# Altium PCB A313_5.PcbDoc (part 1 of 4)
Units mm, origin at the board's own origin, x right, y up, seen from the top; angles counter-clockwise.
Board outline 230.01 x 157.01 mm, 2 copper layers (Top Layer, Bottom Layer); 173 components, 153 nets, 1229 pads, 884 vias.
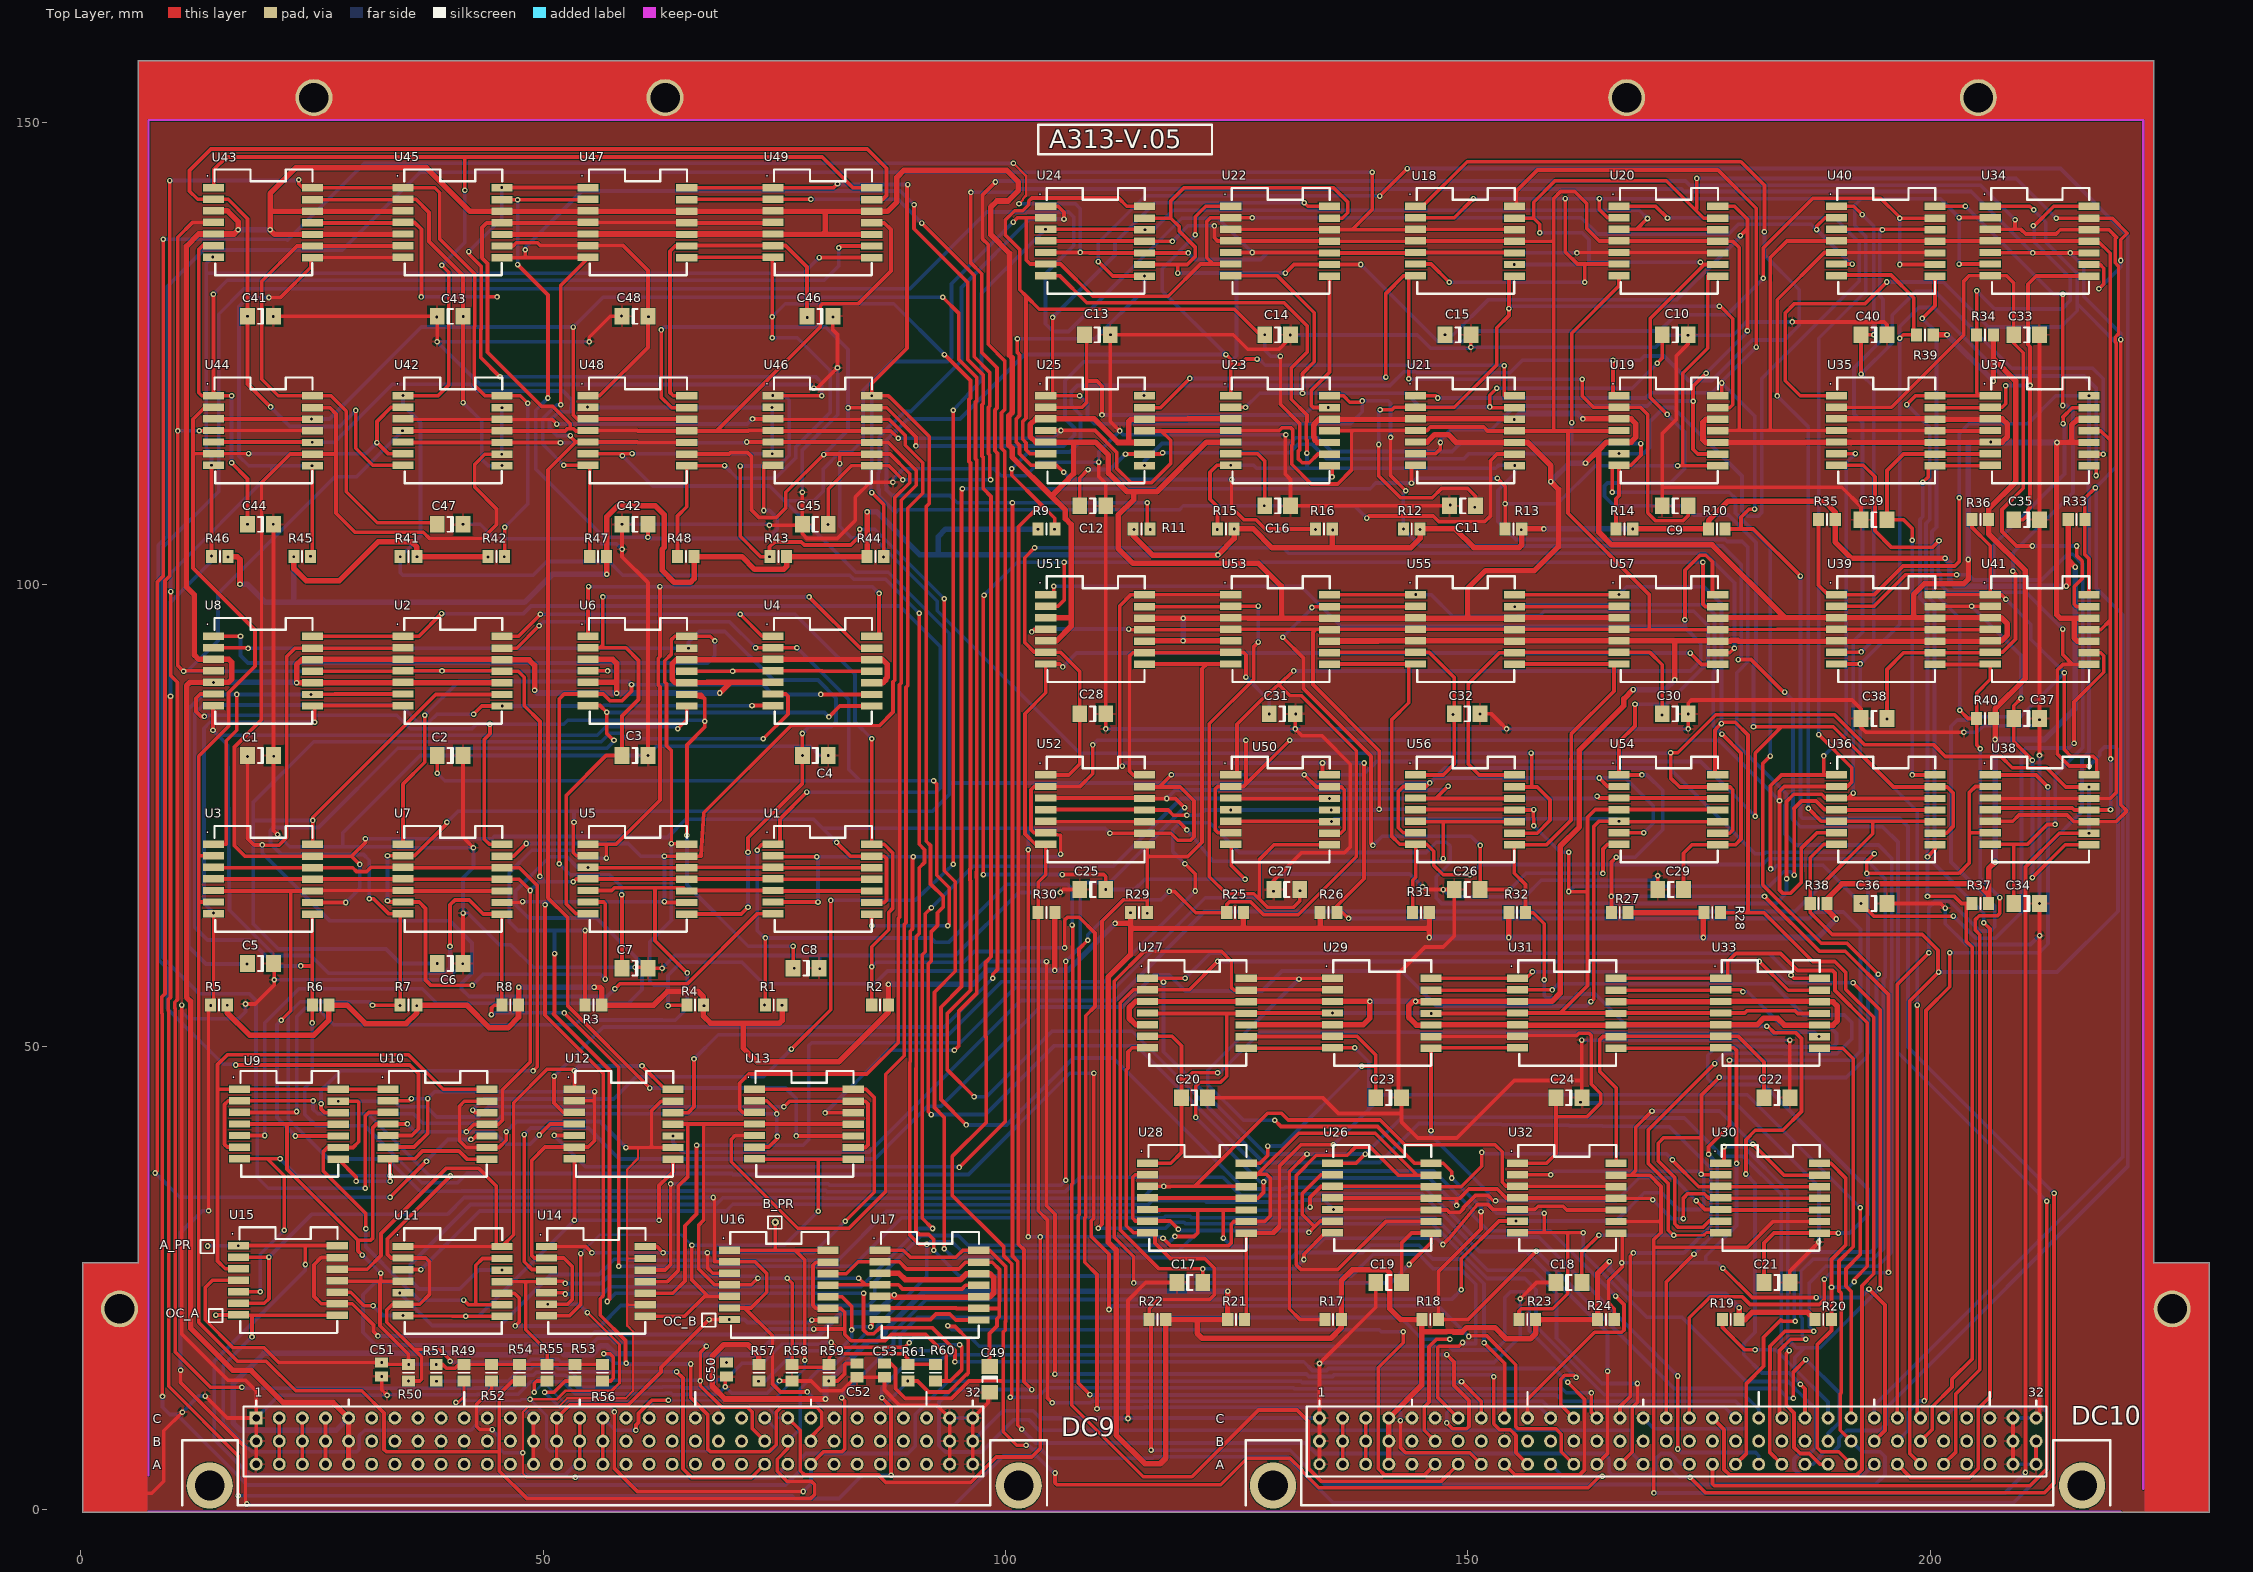
[diagram p0: Top Layer view]
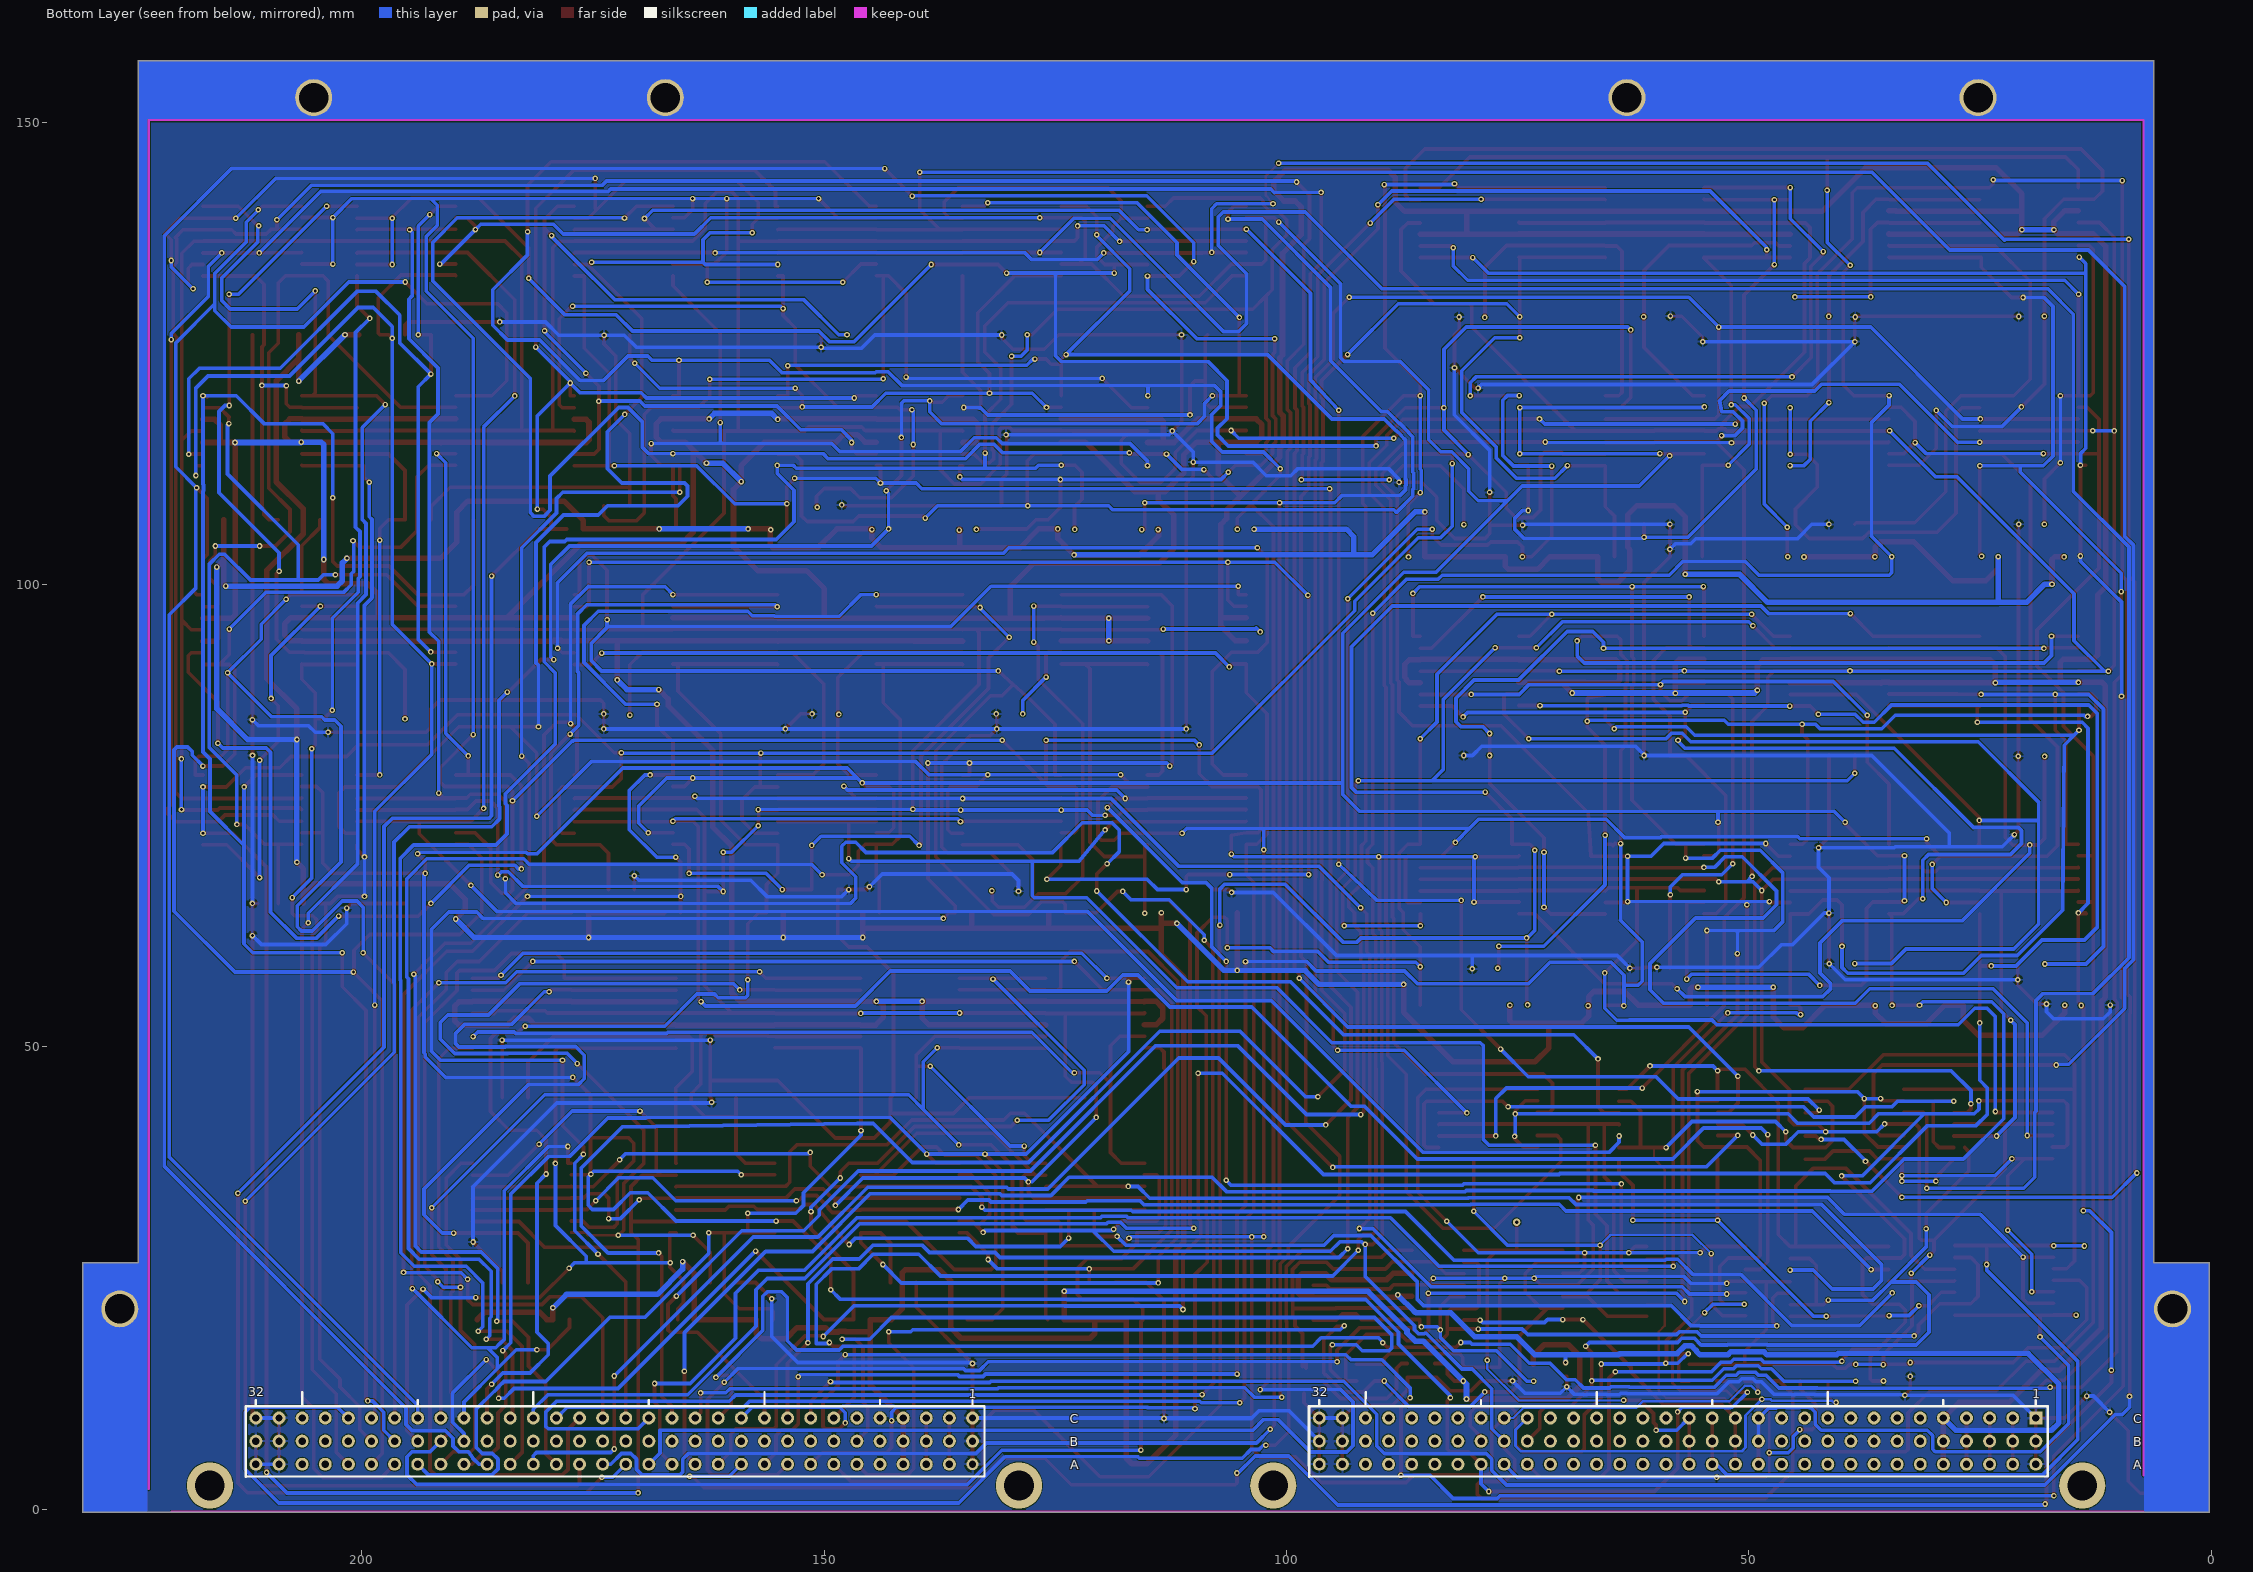
[diagram p1: Bottom Layer view, seen from below]

## Layer stack, top to bottom
Top Solder: solder mask 0.0102, Solder Resist, Dk 3.5
Top Layer: signal copper 0.0356
Dielectric 1: dielectric 0.32, FR-4, Dk 4.8
Bottom Layer: signal copper 0.0356
Bottom Solder: solder mask 0.0102, Solder Resist, Dk 3.5

## Board outline
0.18,-0.354 0.18,26.646 cw(c0.187,26.646) 0.187,26.653 6.18,26.653 6.18,156.646 cw(c6.187,156.646) 6.187,156.653 224.187,156.653 cw(c224.187,156.646) 224.194,156.646 224.194,26.653 230.187,26.653 cw(c230.187,26.646) 230.194,26.646 230.194,-0.354 cw(c230.187,-0.354) 230.187,-0.361 0.187,-0.361 cw(c0.187,-0.354)

## Design rules (kind name [scope] priority, off if disabled: settings)
Clearance [All] p1: gap=0.1 ignorepadtopadclearanceinfootprint=FALSE
HoleSize [All] p1: absolutevalues=TRUE maxlimit=10 minlimit=0.025 maxpercent=80.000 minpercent=20.000
MinimumSolderMaskSliver [All] p1: minsoldermaskwidth=0
PolygonConnect [All] p1: connectstyle=Relief reliefconductorwidth=0.254 reliefentries=4 polygonreliefangle="90 Angle" airgapwidth=0.254
RoutingVias [All] p1: holewidth=0.3 width=0.6 viastyle="Through Hole" minholewidth=0.3 minwidth=0.6 maxholewidth=0.3 maxwidth=0.6
SilkToSilkClearance [All] p1: silktosilkclearance=0.1
SilkToSolderMaskClearance [IsPad] p1: minsilkscreentomaskgap=0 clearancetoexposedcopper=TRUE
SolderMaskExpansion [All] p1: expansion=0.102
Width [All] p1: maxlimit=1 minlimit=0.254 preferedwidth=0.4
26 further rules are at their usual default settings.

## Components (designator, comment, footprint, x,y, rotation, side; value= is the part's Value field where it differs from the comment)
C1 "4,7uf" 1206 19.425,81.5 r180 top
C2 "4,7uf" 1206 39.925,81.5 r180 top
C3 "4,7uf" 1206 59.925,81.5 r180 top
C4 "4,7uf" 1206 79.425,81.5 r180 top
C5 "4,7uf" 1206 19.425,59 r180 top
C6 "4,7uf" 1206 39.925,59 r180 top
C7 "4,7uf" 1206 59.925,58.5 r180 top
C8 "4,7uf" 1206 78.425,58.5 r180 top
C9 "4,7uf" 1206 172.425,108.5 r0 top
C10 "4,7uf" 1206 172.425,127 r180 top
C11 "4,7uf" 1206 149.425,108.5 r0 top
C12 "4,7uf" 1206 109.425,108.5 r180 top
C13 "4,7uf" 1206 109.925,127 r180 top
C14 "4,7uf" 1206 129.425,127 r180 top
C15 "4,7uf" 1206 148.925,127 r180 top
C16 "4,7uf" 1206 129.425,108.5 r180 top
C17 "4,7uf" 1206 119.925,24.5 r0 top
C18 "4,7uf" 1206 160.925,24.5 r0 top
C19 "4,7uf" 1206 141.425,24.5 r0 top
C20 "4,7uf" 1206 120.425,44.5 r180 top
C21 "4,7uf" 1206 183.425,24.5 r180 top
C22 "4,7uf" 1206 183.425,44.5 r180 top
C23 "4,7uf" 1206 141.425,44.5 r180 top
C24 "4,7uf" 1206 160.925,44.5 r180 top
C25 "4,7uf" 1206 109.425,67 r0 top
C26 "4,7uf" 1206 149.925,67 r0 top
C27 "4,7uf" 1206 130.425,67 r0 top
C28 "4,7uf" 1206 109.425,86 r180 top
C29 "4,7uf" 1206 171.925,67 r0 top
C30 "4,7uf" 1206 172.425,86 r180 top
C31 "4,7uf" 1206 129.925,86 r180 top
C32 "4,7uf" 1206 149.925,86 r180 top
C33 "4,7uf" 1206 210.425,127 r180 top
C34 "4,7uf" 1206 210.425,65.5 r180 top
C35 "4,7uf" 1206 210.425,107 r180 top
C36 "4,7uf" 1206 193.925,65.5 r180 top
C37 "4,7uf" 1206 210.425,85.5 r180 top
C38 "4,7uf" 1206 193.925,85.5 r0 top
C39 "4,7uf" 1206 193.925,107 r0 top
C40 "4,7uf" 1206 193.925,127 r180 top
C41 "4,7uf" 1206 19.425,129 r180 top
C42 "4,7uf" 1206 59.925,106.5 r0 top
C43 "4,7uf" 1206 39.925,129 r0 top
C44 "4,7uf" 1206 19.425,106.5 r180 top
C45 "4,7uf" 1206 79.425,106.5 r0 top
C46 "4,7uf" 1206 79.925,129 r180 top
C47 "4,7uf" 1206 39.925,106.5 r180 top
C48 "4,7uf" 1206 59.925,129 r0 top
C49 "4,7uf" 1206 98.307,14.025 r270 top
C50 "0,068uf" C0805 69.825,15.1 r270 top
C51 "0,068uf" C0805 32.525,15.1 r270 top
C52 "0,068uf" C0805 83.925,15 r270 top
C53 "0,01uf" C0805 86.925,15 r270 top
DC9 "DC96c" DC96c_DUC#1 53.225,22.925 r0 top locked
DC10 "DC96c" DC96c_DUC#2 168.225,22.925 r0 top locked
R1 "330k" 6-0805_N 74.925,54.5 r180 top
R2 "330k" 6-0805_N 86.425,54.5 r180 top
R3 "330k" 6-0805_N 55.425,54.5 r180 top
R4 "330k" 6-0805_N 66.425,54.5 r180 top
R5 "330k" 6-0805_N 14.925,54.5 r0 top
R6 "330k" 6-0805_N 25.925,54.5 r0 top
R7 "330k" 6-0805_N 35.425,54.5 r0 top
R8 "330k" 6-0805_N 46.425,54.5 r0 top
R9 "330k" 6-0805_N 104.425,106 r0 top
R10 "330k" 6-0805_N 176.925,106 r0 top
R11 "330k" 6-0805_N 114.7,106 r0 top
R12 "330k" 6-0805_N 143.925,106 r180 top
R13 "330k" 6-0805_N 154.925,106 r0 top
R14 "330k" 6-0805_N 166.925,106 r0 top
R15 "330k" 6-0805_N 123.825,106 r0 top
R16 "330k" 6-0805_N 134.425,106 r0 top
R17 "330k" 6-0805_N 135.425,20.5 r180 top
R18 "330k" 6-0805_N 145.925,20.5 r0 top
R19 "330k" 6-0805_N 178.425,20.5 r180 top
R20 "330k" 6-0805_N 188.425,20.5 r0 top
R21 "330k" 6-0805_N 124.925,20.5 r180 top
R22 "330k" 6-0805_N 116.425,20.5 r0 top
R23 "330k" 6-0805_N 156.425,20.5 r0 top
R24 "330k" 6-0805_N 164.925,20.5 r180 top
R25 "330k" 6-0805_N 124.825,64.5 r180 top
R26 "330k" 6-0805_N 134.925,64.5 r0 top
R27 "330k" 6-0805_N 166.425,64.5 r180 top
R28 "330k" 6-0805_N 176.425,64.5 r0 top
R29 "330k" 6-0805_N 114.425,64.5 r180 top
R30 "330k" 6-0805_N 104.425,64.5 r0 top
R31 "330k" 6-0805_N 144.925,64.5 r0 top
R32 "330k" 6-0805_N 155.325,64.5 r180 top
R33 "330k" 6-0805_N 215.825,107 r0 top
R34 "330k" 6-0805_N 205.925,127 r180 top
R35 "330k" 6-0805_N 188.825,107 r180 top
R36 "330k" 6-0805_N 205.425,107 r180 top
R37 "330k" 6-0805_N 205.425,65.5 r0 top
R38 "330k" 6-0805_N 187.925,65.5 r0 top
R39 "330k" 6-0805_N 199.425,127 r0 top
R40 "330k" 6-0805_N 205.925,85.5 r0 top
R41 "330k" 6-0805_N 35.425,103 r180 top
R42 "330k" 6-0805_N 44.925,103 r0 top
R43 "330k" 6-0805_N 75.425,103 r180 top
R44 "330k" 6-0805_N 85.925,103 r0 top
R45 "330k" 6-0805_N 23.925,103 r180 top
R46 "330k" 6-0805_N 15.025,103 r0 top
R47 "330k" 6-0805_N 55.925,103 r0 top
R48 "330k" 6-0805_N 65.425,103 r0 top
R49 "330k" 6-0805_N 41.425,14.75 r90 top
R50 "330k" 6-0805_N 35.425,14.75 r90 top
R51 "330k" 6-0805_N 38.425,14.75 r90 top
R52 "330k" 6-0805_N 44.425,14.75 r90 top
R53 "330k" 6-0805_N 53.425,14.75 r270 top
R54 "330k" 6-0805_N 47.425,14.75 r270 top
R55 "330k" 6-0805_N 50.425,14.75 r270 top
R56 "330k" 6-0805_N 56.425,14.75 r270 top
R57 "3,3k" 6-0805_N 73.325,14.75 r90 top
R58 "1,2k" 6-0805_N 76.925,14.75 r90 top
R59 "1,8k" 6-0805_N 80.925,14.75 r270 top
R60 "330k" 6-0805_N 92.425,14.75 r90 top
R61 "330k" 6-0805_N 89.425,14.75 r90 top
U1 "168KT2B_1" 168KT2B 79.925,68 r0 top
U2 "168KT2B_1" 168KT2B 39.925,90.5 r0 top
U3 "168KT2B_1" 168KT2B 19.425,68 r0 top
U4 "168KT2B_1" 168KT2B 79.925,90.5 r0 top
U5 "168KT2B_1" 168KT2B 59.925,68 r0 top
U6 "168KT2B_1" 168KT2B 59.925,90.5 r0 top
U7 "168KT2B_1" 168KT2B 39.925,68 r0 top
U8 "168KT2B_1" 168KT2B 19.425,90.5 r0 top
U9 "168KT2B_1" 168KT2B 22.225,41.5 r0 top
U10 "168KT2B_1" 168KT2B 38.3,41.5 r0 top
U11 "168KT2B_1" 168KT2B 39.925,24.5 r0 top
U12 "168KT2B_1" 168KT2B 58.425,41.5 r0 top
U13 "168KT2B_1" 168KT2B 77.925,41.5 r0 top
U14 "168KT2B_1" 168KT2B 55.425,24.5 r0 top
U15 "168KT2B_1" 168KT2B 22.125,24.6 r0 top
U16 "168KT2B_1" 168KT2B 75.2,24.1 r0 top
U17 "168KT2B_1" 168KT2B 91.5,24.1 r0 top
U18 "168KT2B_1" 168KT2B 149.425,137 r0 top
U19 "168KT2B_1" 168KT2B 171.425,116.5 r0 top
U20 "168KT2B_1" 168KT2B 171.425,137 r0 top
U21 "168KT2B_1" 168KT2B 149.425,116.5 r0 top
U22 "168KT2B_1" 168KT2B 129.425,137 r0 top
U23 "168KT2B_1" 168KT2B 129.425,116.5 r0 top
U24 "168KT2B_1" 168KT2B 109.425,137 r0 top
U25 "168KT2B_1" 168KT2B 109.425,116.5 r0 top
U26 "168KT2B_1" 168KT2B 140.425,33.5 r0 top
U27 "168KT2B_1" 168KT2B 120.425,53.5 r0 top
U28 "168KT2B_1" 168KT2B 120.425,33.5 r0 top
U29 "168KT2B_1" 168KT2B 140.425,53.5 r0 top
U30 "168KT2B_1" 168KT2B 182.425,33.5 r0 top
U31 "168KT2B_1" 168KT2B 160.425,53.5 r0 top
U32 "168KT2B_1" 168KT2B 160.425,33.5 r0 top
U33 "168KT2B_1" 168KT2B 182.425,53.5 r0 top
U34 "168KT2B_1" 168KT2B 211.571,137 r0 top
U35 "168KT2B_1" 168KT2B 194.925,116.5 r0 top
U36 "168KT2B_1" 168KT2B 194.925,75.5 r0 top
U37 "168KT2B_1" 168KT2B 211.571,116.5 r0 top
U38 "168KT2B_1" 168KT2B 211.571,75.5 r0 top
U39 "168KT2B_1" 168KT2B 194.925,95 r0 top
U40 "168KT2B_1" 168KT2B 194.925,137 r0 top
U41 "168KT2B_1" 168KT2B 211.571,95 r0 top
U42 "168KT2B_1" 168KT2B 39.925,116.5 r0 top
U43 "168KT2B_1" 168KT2B 19.425,139 r0 top
U44 "168KT2B_1" 168KT2B 19.425,116.5 r0 top
U45 "168KT2B_1" 168KT2B 39.925,139 r0 top
U46 "168KT2B_1" 168KT2B 79.925,116.5 r0 top
U47 "168KT2B_1" 168KT2B 59.925,139 r0 top
U48 "168KT2B_1" 168KT2B 59.925,116.5 r0 top
U49 "168KT2B_1" 168KT2B 79.925,139 r0 top
U50 "168KT2B_1" 168KT2B 129.425,75.5 r0 top
U51 "168KT2B_1" 168KT2B 109.425,95 r0 top
U52 "168KT2B_1" 168KT2B 109.425,75.5 r0 top
U53 "168KT2B_1" 168KT2B 129.425,95 r0 top
U54 "168KT2B_1" 168KT2B 171.425,75.5 r0 top
U55 "168KT2B_1" 168KT2B 149.425,95 r0 top
U56 "168KT2B_1" 168KT2B 149.425,75.5 r0 top
U57 "168KT2B_1" 168KT2B 171.425,95 r0 top

## Footprints (in the part's own frame and the unit in brackets; to place one, negate y for a bottom-side part, rotate by r counter-clockwise, add the part's x,y. Pads: shape width x height; smd on the part's side, far side on the other; paste and mask are expansions set on the pad)
6-0805_N [mm] "Chip Resistor, Body 2.0x1.2mm, IPC Medium Density"
  rect 1.2x1.4 smd: 1(-0.9,0) 2(0.9,0)
  silkscreen extent 0,-0.6 0,0.6, body extent -1.07,-0.7 1.07,0.7, height 0.7
168KT2B [mm]
  rect 2.286x0.8 smd: 1(-5.075,3.9) 2(-5.075,2.65) 3(-5.075,1.4) 4(-5.075,0.15) 5(-5.075,-1.1) 6(-5.075,-2.35) 7(-5.075,-3.6) 8(5.6,-3.65) 9(5.6,-2.4) 10(5.6,-1.15) 11(5.6,0.1) 12(5.6,1.35) 13(5.6,2.6) 14(5.6,3.9)
  silkscreen extent -4.97,-5.56 5.63,5.87
1206 [mm] "Chip Capacitor; Body 3.2 x 1.6 mm (LxW typ)"
  rect 1.6x1.8 smd mask+0.15: 1(-1.4,0) 2(1.4,0)
  silkscreen extent -0.3,-0.8 0.3,0.8
C0805 [mm] "Chip Capacitor, Body 2.0x1.3mm, IPC High Density"
  rect 1.1x1.4 smd: 1(-0.75,0) 2(0.75,0)
  body extent -1.1,-0.72 1.1,0.72, height 1.4
DC96c_DUC#1 [mm]
  round 5 hole 3.2: A(-39.3,-20.375) B(48.2,-20.375)
  round 1.4 hole 0.8: A1(-34.275,-18.075) A2(-31.775,-18.075) A3(-29.275,-18.075) A4(-26.775,-18.075) A5(-24.275,-18.075) A6(-21.775,-18.075) A7(-19.275,-18.075) A8(-16.775,-18.075) A9(-14.275,-18.075) A10(-11.775,-18.075) A11(-9.275,-18.075) A12(-6.775,-18.075) A13(-4.275,-18.075) A14(-1.775,-18.075) A15(0.725,-18.075) A16(3.225,-18.075) A17(5.725,-18.075) A18(8.225,-18.075) A19(10.725,-18.075) A20(13.225,-18.075) A21(15.725,-18.075) A22(18.225,-18.075) A23(20.725,-18.075) A24(23.225,-18.075) A25(25.725,-18.075) A26(28.225,-18.075) A27(30.725,-18.075) A28(33.225,-18.075) A29(35.725,-18.075) A30(38.225,-18.075) A31(40.725,-18.075) A32(43.225,-18.075) B1(-34.275,-15.575) B2(-31.775,-15.575) B3(-29.275,-15.575) B4(-26.775,-15.575) B5(-24.275,-15.575) B6(-21.775,-15.575) B7(-19.275,-15.575) B8(-16.775,-15.575) B9(-14.275,-15.575) B10(-11.775,-15.575) B11(-9.275,-15.575) B12(-6.775,-15.575) B13(-4.275,-15.575) B14(-1.775,-15.575) B15(0.725,-15.575) B16(3.225,-15.575) B17(5.725,-15.575) B18(8.225,-15.575) B19(10.725,-15.575) B20(13.225,-15.575) B21(15.725,-15.575) B22(18.225,-15.575) B23(20.725,-15.575) B24(23.225,-15.575) B25(25.725,-15.575) B26(28.225,-15.575) B27(30.725,-15.575) B28(33.225,-15.575) B29(35.725,-15.575) B30(38.225,-15.575) B31(40.725,-15.575) B32(43.225,-15.575) C2(-31.775,-13.075) C3(-29.275,-13.075) C4(-26.775,-13.075) C5(-24.275,-13.075) C6(-21.775,-13.075) C7(-19.275,-13.075) C8(-16.775,-13.075) C9(-14.275,-13.075) C10(-11.775,-13.075) C11(-9.275,-13.075) C12(-6.775,-13.075) C13(-4.275,-13.075) C14(-1.775,-13.075) C15(0.725,-13.075) C16(3.225,-13.075) C17(5.725,-13.075) C18(8.225,-13.075) C19(10.725,-13.075) C20(13.225,-13.075) C21(15.725,-13.075) C22(18.225,-13.075) C23(20.725,-13.075) C24(23.225,-13.075) C25(25.725,-13.075) C26(28.225,-13.075) C27(30.725,-13.075) C28(33.225,-13.075) C29(35.725,-13.075) C30(38.225,-13.075) C31(40.725,-13.075) C32(43.225,-13.075)
  rect 1.4x1.4 hole 0.8: C1(-34.275,-13.075)
  silkscreen extent -42.25,-22.5 51.25,-10.3
DC96c_DUC#2 [mm]
  round 5 hole 3.2: A(-39.3,-20.375) B(48.2,-20.375)
  round 1.3 hole 0.8: A1(-34.275,-18.075)
  round 1.4 hole 0.8: A2(-31.775,-18.075) A3(-29.275,-18.075) A4(-26.775,-18.075) A5(-24.275,-18.075) A6(-21.775,-18.075) A7(-19.275,-18.075) A8(-16.775,-18.075) A9(-14.275,-18.075) A10(-11.775,-18.075) A11(-9.275,-18.075) A12(-6.775,-18.075) A13(-4.275,-18.075) A14(-1.775,-18.075) A15(0.725,-18.075) A16(3.225,-18.075) A17(5.725,-18.075) A18(8.225,-18.075) A19(10.725,-18.075) A20(13.225,-18.075) A21(15.725,-18.075) A22(18.225,-18.075) A23(20.725,-18.075) A24(23.225,-18.075) A25(25.725,-18.075) A26(28.225,-18.075) A27(30.725,-18.075) A28(33.225,-18.075) A29(35.725,-18.075) A30(38.225,-18.075) A31(40.725,-18.075) A32(43.225,-18.075) B1(-34.275,-15.575) B2(-31.775,-15.575) B3(-29.275,-15.575) B4(-26.775,-15.575) B5(-24.275,-15.575) B6(-21.775,-15.575) B7(-19.275,-15.575) B8(-16.775,-15.575) B9(-14.275,-15.575) B10(-11.775,-15.575) B11(-9.275,-15.575) B12(-6.775,-15.575) B13(-4.275,-15.575) B14(-1.775,-15.575) B15(0.725,-15.575) B16(3.225,-15.575) B17(5.725,-15.575) B18(8.225,-15.575) B19(10.725,-15.575) B20(13.225,-15.575) B21(15.725,-15.575) B22(18.225,-15.575) B23(20.725,-15.575) B24(23.225,-15.575) B25(25.725,-15.575) B26(28.225,-15.575) B27(30.725,-15.575) B28(33.225,-15.575) B29(35.725,-15.575) B30(38.225,-15.575) B31(40.725,-15.575) B32(43.225,-15.575) C1(-34.275,-13.075) C2(-31.775,-13.075) C3(-29.275,-13.075) C4(-26.775,-13.075) C5(-24.275,-13.075) C6(-21.775,-13.075) C7(-19.275,-13.075) C8(-16.775,-13.075) C9(-14.275,-13.075) C10(-11.775,-13.075) C11(-9.275,-13.075) C12(-6.775,-13.075) C13(-4.275,-13.075) C14(-1.775,-13.075) C15(0.725,-13.075) C16(3.225,-13.075) C17(5.725,-13.075) C18(8.225,-13.075) C19(10.725,-13.075) C20(13.225,-13.075) C21(15.725,-13.075) C22(18.225,-13.075) C23(20.725,-13.075) C24(23.225,-13.075) C25(25.725,-13.075) C26(28.225,-13.075) C27(30.725,-13.075) C28(33.225,-13.075) C29(35.725,-13.075) C30(38.225,-13.075) C31(40.725,-13.075) C32(43.225,-13.075)
  silkscreen extent -42.25,-22.5 51.25,-10.3

## Part data
C1 C2 C3 C4 C5 C6 C7 C8 C9 C10 C11 C12 C13 C14 C15 C16 C17 C18 C19 C20 C21 C22 C23 C24 C25 C26 C27 C28 C29 C30 C31 C32 C33 C34 C35 C36 C37 C38 C39 C40 C41 C42 C43 C44 C45 C46 C47 C48: library part CAP
C49 C50 C51 C52 C53: library part "CAP NP"
R1 R2 R3 R4 R5 R6 R7 R8 R9 R10 R11 R12 R13 R14 R15 R16 R17 R18 R19 R20 R21 R22 R23 R24 R25 R26 R27 R28 R29 R30 R31 R32 R33 R34 R35 R36 R37 R38 R39 R40 R41 R42 R43 R44 R45 R46 R47 R48 R49 R50 R51 R52 R53 R54 R55 R56 R57 R58 R59 R60 R61: library part R
U1 U2 U3 U4 U5 U7 U8 U9 U10 U11 U12 U14 U15 U16 U17 U18 U19 U20 U21 U22 U23 U24 U25 U26 U27 U28 U29 U30 U31 U32 U33 U34 U35 U36 U37 U38 U39 U40 U41 U42 U43 U44 U45 U46 U47 U48 U49 U50 U51 U52 U53 U54 U55 U56 U57: library part 168KT2B_4
U6: library part 168KT2B_5
U13: library part 168KT2B_7

## Free pads (board coordinates)
  round 0.8 hole 0.4: 3(75.1,31.025)
  round 4 hole 3.2 mask+0.15: ck(4.175,21.65) ck(25.2,152.65) ck(63.175,152.65) ck(167.175,152.65) ck(205.2,152.65) ck(226.175,21.65)

## Via types
v1: diameter 0.6, hole 0.3, Top Layer to Bottom Layer, 884 vias

## Nets (pads, with @x,y where several pads share a name; then routed paths per layer and width w, separated by ;. In a path a pad name is that pad's centre, name@x,y a point inside that pad or via, vN(x,y) a via of type N, cw(c..) or ccw(c..) an arc to the next point about the centre after c; other vN are vias at no path point)
+3,5V: DC9.A3 DC9.B3 DC9.C3 | length 5
  Top Layer w0.4: DC9.A3@23.95,4.85 DC9.B3@23.95,7.35 DC9.C3@23.95,9.85
+5V: DC9.A2 DC9.B2 DC9.C2 | length 5
  Top Layer w0.4: DC9.A2@21.45,4.85 DC9.B2@21.45,7.35 DC9.C2@21.45,9.85
+6,3V: DC9.A4 DC9.B4 DC9.C4 | length 5
  Top Layer w0.4: DC9.A4@26.45,4.85 DC9.B4@26.45,7.35 DC9.C4@26.45,9.85
+12,6V: C52.1 DC10.A4 DC10.B4 DC10.C4 R1.1 R2.1 R3.1 R4.1 R5.2 R6.2 R7.2 R8.2 R9.1 R10.1 R11.1 R12.1 R13.2 R14.2 R15.2 R16.2 R17.1 R18.1 R19.1 R20.1 R21.2 R22.2 R23.2 R24.2 R25.1 R26.1 R27.1 R28.1 R29.2 R30.2 R31.2 R32.2 R33.1 R34.1 R35.1 R36.1 R37.2 R38.2 R39.2 R40.2 R41.1 R42.1 R43.1 R44.1 R45.2 R46.2 R47.2 R48.2 R57.2 R59.2 | length 942.9
  Top Layer w0.4: v1(80.875,13.85) R59.2@80.925,13.85 81.825,13.85 82.577,14.602 82.577,15.598 82.729,15.75 C52.1@83.925,15.75
  Top Layer w0.6: v1(15.825,54.5) 15.825,53.664 18.239,51.25 25.2,51.25 26.825,52.875 R6.2@26.825,54.5 28.762,54.5 30.762,52.5 35.161,52.5 36.325,53.664 R7.2@36.325,54.5 41.725,54.5 44.175,52.05 46.175,52.05 47.325,53.2 R8.2@47.325,54.5 47.35,54.525 v1(47.35,56.425) ; R46.2@15.925,103 16.9,103 17.205,102.695 v1(17.205,100.019) ; v1(23.025,103) 23.025,101.725 24.375,100.375 27.924,100.375 32.149,104.6 35.775,104.6 36.325,104.05 R41.1@36.325,103 R42.1@44.025,103 ; v1(55.5,56.425) 56.159,56.425 56.325,56.259 R3.1@56.325,54.5 61.95,54.5 63.425,55.975 66.761,55.975 67.325,55.411 R4.1@67.325,54.5 67.325,53.3 68.075,52.55 71.625,52.55 ; v1(56.875,101.1) 56.875,107.333 58.042,108.5 62.125,108.5 63.075,107.55 63.075,104 62.85,103.775 62.85,101.543 64.168,100.225 65.925,100.225 66.325,100.625 R48.2@66.325,103 71.475,103 72.85,101.625 76,101.625 76.325,101.95 R43.1@76.325,103 R44.1@85.025,103 v1(85.025,107.846) ; R57.2@73.325,15.65 73.325,16.58 72.13,17.775 69.505,17.775 68.275,16.545 68.275,13.282 69.653,11.905 v1(80.524,11.905) ; v1(75.825,54.5) 75.825,52.825 75.55,52.55 71.625,52.55 ; v1(87.325,56.737) 87.325,53.731 81.969,48.375 73.125,48.375 71.625,49.875 71.625,52.55 ; v1(105.325,58.261) R30.2@105.325,64.5 ; v1(111.845,63.341) 113.525,63.341 ; R29.2@113.525,64.5 113.525,63.341 ; R11.1@113.8,106 113.8,105.275 115.895,103.18 v1@122.788,103.18 ; v1(122.97,103.194) 124.725,104.949 v1(124.725,106) 126.793,106 128.837,103.956 135.225,103.956 ; v1(124.025,23.55) R21.2@124.025,20.5 120.725,20.5 ; R25.1@125.725,64.5 125.725,62.95 125.575,62.8 ; R26.1@134.025,64.5 134.025,62.975 133.85,62.8 ; R16.2@135.325,106 135.325,104.056 135.225,103.956 ; DC10.A4@141.45,4.85 DC10.C4@141.45,9.85 144.994,13.394 144.994,20.5 142.723,20.5 141.563,21.66 141.563,25.546 141.233,25.876 137.493,25.876 136.325,24.708 136.325,19.628 135.172,18.475 121.263,18.475 120.725,19.013 120.725,20.5 ; 145.05,19.175 147.642,19.175 147.696,19.229 148.404,19.229 148.483,19.15 149.378,19.15 149.856,19.628 152.923,19.628 154.151,18.4 156.742,18.4 157.339,18.997 157.339,20.5 R24.2@164.025,20.5 164.025,25.483 v1(165.308,26.766) ; v1(145.825,61.817) 145.825,62.75 ; R31.2@145.825,64.5 145.825,62.75 ; v1(154.425,61.817) R32.2@154.425,64.5 ; v1(158.225,106) R13.2@155.825,106 155.825,104.25 155.55,103.975 150.649,103.975 148.624,106 R12.1@144.825,106 144.825,104.972 143.809,103.956 135.225,103.956 ; R27.1@167.325,64.5 R28.1@175.525,64.5 175.475,64.45 v1(175.475,61.817) ; v1(167.825,106) R10.1@176.025,106 176.025,106.896 178.13,109.001 188.549,109.001 189.725,107.825 189.725,104.588 191.487,102.826 v1(201.609,102.826) ; v1(179.325,21.762) R19.1@179.325,20.5 179.974,20.5 180.74,21.266 186.759,21.266 R20.1@187.525,20.5 ; v1(189.841,63.816) 188.825,64.832 188.825,65.975 190.456,67.606 205.167,67.606 206.325,66.448 ; R39.2@200.325,127 v1(201.815,127) ; R37.2@206.325,65.5 206.325,66.448 ; v1(206.825,121.99) 206.825,124.445 ; R34.1@206.825,127 206.825,124.445 ; v1(207.019,69.955) 206.325,69.261 206.325,66.448 ; v1(207.019,83.23) 207.019,86.557 210.255,89.793 210.255,101.55 206.325,105.48 206.325,108.164 209.25,111.089 209.25,120.877 209.246,120.881 209.246,122.024 206.825,124.445 ; v1(214.704,99.823) 214.925,100.044 214.925,102.629 ; R33.1@214.925,107 214.925,102.629 ; v1(215.68,101.873) 214.925,102.629 ; 113.525,62.575 113.525,59.967 111.093,57.535 111.093,28.873 111.947,28.019 111.947,8.02 115.063,4.904 116.732,4.904 117.325,5.497 R22.2@117.325,20.5 120.725,20.5 ; 113.525,62.575 113.525,63.341 ; 113.525,62.575 113.75,62.8 125.575,62.8 ; 125.575,62.8 133.85,62.8 ; 133.85,62.8 145.775,62.8 145.825,62.75
  Bottom Layer w0.6: v1(17.205,100.019) 17.992,100.019 19.948,98.063 22.975,98.063 ; v1(23.025,103) 23.025,98.113 22.975,98.063 ; v1(47.35,56.425) v1(55.5,56.425) ; v1(56.875,101.1) 50.987,101.1 47.95,98.063 22.975,98.063 ; v1(80.524,11.905) 80.524,13.499 v1(80.875,13.85) 85.175,18.15 86.047,18.15 86.958,19.061 86.958,19.328 91.18,23.55 v1(124.025,23.55) ; v1(85.025,107.846) 86.079,107.846 90.731,103.194 92.7,103.194 ; v1(87.325,56.737) 96.462,56.737 97.986,58.261 v1(105.325,58.261) 106.765,58.261 v1(111.845,63.341) ; v1(103.5,105.975) 93.525,105.975 92.7,105.15 92.7,103.194 ; v1(122.97,103.194) 92.7,103.194 ; v1(145.825,61.817) v1(154.425,61.817) v1(175.475,61.817) 187.842,61.817 v1(189.841,63.816) ; v1(158.225,106) v1(167.825,106) ; v1(165.308,26.766) 165.308,25.945 168.028,23.225 177.862,23.225 v1(179.325,21.762) ; v1(201.609,102.826) 202.099,102.335 202.099,100.4 202.676,99.823 v1(214.704,99.823) ; v1(201.815,127) v1(206.825,121.99) ; v1(207.019,69.955) v1(207.019,83.23) 212.353,83.23 215.68,86.557 v1(215.68,101.873)
  other v1: 36.325,54.425 67.375,54.426 113.525,64.491 15.9,102.975 44.025,102.966 36.35,102.991 135.375,105.875 113.875,105.938 144.825,105.938 155.775,105.925
-6,3V: C50.1 DC9.A5 DC9.B5 DC9.C5 U2.3 U2.5 U2.10 U2.12 U4.3 U4.5 U4.10 U4.12 U6.3 U6.5 U6.10 U6.12 U8.3 U8.5 U8.10 U8.12 U17.3 U17.5 U17.10 U17.12 U19.3 U19.5 U19.10 U19.12 U21.3 U21.5 U21.10 U21.12 U23.3 U23.5 U23.10 U23.12 U25.3 U25.5 U25.10 U25.12 U27.3 U27.5 U27.10 U27.12 U29.3 U29.5 U29.10 U29.12 U31.3 U31.5 U31.10 U31.12 U33.3 U33.5 U33.10 U33.12 U35.3 U35.5 U35.10 U35.12 U37.3 U37.5 U37.10 U37.12 U39.3 U39.5 U39.10 U39.12 U41.3 U41.5 U41.10 U41.12 U43.3 U43.5 U43.10 U43.12 U45.3 U45.5 U45.10 U45.12 U47.3 U47.5 U47.10 U47.12 U49.3 U49.5 U49.10 U49.12 U51.3 U51.5 U51.10 U51.12 U53.3 U53.5 U53.10 U53.12 U55.3 U55.5 U55.10 U55.12 U57.3 U57.5 U57.10 U57.12 | length 1353.3
  Top Layer w0.254: v1(69.808,15.85) C50.1@69.825,15.85
  Top Layer w0.6: U43.3@14.35,140.4 15.85,140.4 17.002,139.248 v1(17.002,138.348) 16.554,137.9 U43.5@14.35,137.9 12.734,137.9 11.4,136.566 11.4,99.741 12.275,98.866 12.275,92.359 12.734,91.9 16,91.9 16.325,91.575 16.325,89.781 15.944,89.4 v1(14.35,89.4) 11.769,89.4 11.425,89.056 11.425,55.332 11.86,54.897 11.86,19.565 16.425,15 18.4,15 21.875,11.525 27.275,11.525 DC9.C5@28.95,9.85 DC9.A5@28.95,4.85 ; U45.5@34.85,137.9 34.8,137.85 20.954,137.85 v1(20.456,138.348) 20.456,140.15 ; U45.3@34.85,140.4 34.096,140.4 34.046,140.35 20.656,140.35 20.456,140.15 ; U2.10@45.525,89.35 35.693,89.35 35.669,89.326 35.594,89.4 U2.5@34.85,89.4 34.8,89.35 23.35,89.35 v1(23.328,89.372) 23.328,91.318 23.86,91.85 U8.12@25.025,91.85 25.075,91.9 45.475,91.9 U2.12@45.525,91.85 48.462,91.85 49.056,91.256 v1(49.056,88.564) ; U45.10@45.525,137.85 45.529,137.854 54.804,137.854 U47.5@54.85,137.9 65.475,137.9 U47.10@65.525,137.85 65.575,137.9 U49.5@74.85,137.9 74.9,137.85 80.196,137.85 ; U6.5@54.85,89.4 57.9,89.4 ; U6.3@54.85,91.9 57.498,91.9 57.925,91.473 v1(57.925,88.225) ; v1(69.097,88.259) 70.238,89.4 ; U4.5@74.85,89.4 70.238,89.4 ; U4.10@85.525,89.35 86.74,89.35 87.033,89.643 87.033,89.782 87.222,89.971 87.222,91.354 86.726,91.85 U4.12@85.525,91.85 85.475,91.9 U4.3@74.85,91.9 74.8,91.85 64.373,91.85 63.928,91.405 63.928,89.746 64.324,89.35 U6.10@65.525,89.35 67.726,89.4 70.238,89.4 ; U49.10@85.525,137.85 80.196,137.85 ; U17.5@86.425,23 v1@87.811,23 ; U17.3@86.425,25.5 88.466,25.5 89.166,24.8 95.117,24.8 95.767,25.45 98.307,25.45 98.697,25.06 98.697,23.34 98.307,22.95 U17.10@97.1,22.95 97.057,22.907 88.063,22.907 88.019,22.95 87.925,22.973 v1@87.811,23 ; v1(87.969,23.159) v1@87.811,23 ; U51.5@104.35,93.9 105.521,93.9 107.095,95.475 107.095,96.375 ; U51.3@104.35,96.4 104.375,96.375 107.095,96.375 ; 113.325,115.344 113.325,115.35 ; U51.10@115.025,93.85 115.075,93.9 v1(119.2,93.9) U53.5@124.35,93.9 ; U51.12@115.025,96.35 v1(119.225,96.35) 119.25,96.35 124.3,96.35 U53.3@124.35,96.4 126.259,96.35 129.85,96.35 ; U25.10@115.025,115.35 113.325,115.35 ; U27.5@115.35,52.4 114.055,52.4 113.375,53.08 113.375,54.22 114.055,54.9 U27.3@115.35,54.9 115.4,54.85 126.025,54.9 126.075,54.9 132.648,54.9 U29.3@135.35,54.9 v1(139.404,54.9) 139.404,53.104 138.7,52.4 126.075,52.4 U27.10@126.025,52.35 ; U23.5@124.35,115.4 121.74,115.4 116.366,110.027 113.875,110.027 ; U23.3@124.35,117.9 119.743,117.9 U25.12@115.025,117.85 113.542,117.85 113.325,117.633 113.325,115.35 ; U23.10@135.025,115.35 133.718,115.35 133.428,115.64 133.428,115.871 133.328,115.971 133.328,117.229 133.437,117.338 133.437,117.427 133.86,117.85 U23.12@135.025,117.85 144.3,117.85 U21.3@144.35,117.9 154.975,117.9 v1(155.025,117.85) ; U21.5@144.35,115.4 145.598,115.4 146.402,116.204 147.889,116.204 148.743,115.35 156.473,115.35 158.962,112.861 v1(158.962,111.119) 159.8,110.281 159.8,104.1 157.2,101.5 151.925,101.5 149.975,99.55 149.975,96.4 ; v1(162.443,117.9) 167.649,117.9 168.175,117.374 168.175,115.926 167.649,115.4 164.996,115.4 164.15,114.554 ; v1(162.721,113.125) 164.15,114.554 ; U31.12@166.025,54.85 177.3,54.85 U33.3@177.35,54.9 187.975,54.9 U33.12@188.025,54.85 189.493,54.85 189.948,54.395 189.948,52.805 189.493,52.35 184.225,52.35 183.495,53.08 181.983,53.08 181.302,52.4 166.075,52.4 U31.10@166.025,52.35 155.4,52.35 U31.5@155.35,52.4 146.075,52.4 U29.10@146.025,52.35 144.433,52.35 143.621,53.163 143.621,54.444 144.077,54.9 v1(144.34,54.9) 144.39,54.85 146.023,54.9 146.025,54.9 152.613,54.9 U31.3@155.35,54.9 159.081,54.9 159.969,55.788 159.969,71.688 162.05,73.77 162.05,82.075 166.867,86.892 166.867,87.617 v1(167.875,88.625) ; U57.3@166.35,96.4 155.886,96.4 U55.12@155.025,96.35 129.85,96.35 ; v1(172.375,89.675) 172.375,93.85 172.325,93.9 ; U57.12@177.025,96.35 177.075,96.4 184.298,96.4 ; U19.12@177.025,117.85 175.737,117.85 175.428,117.541 175.428,115.64 175.718,115.35 186.511,115.35 186.561,115.4 191.359,115.4 191.409,115.35 200.525,115.375 206.525,115.375 v1(206.55,115.4) ; U35.3@189.85,117.9 200.475,117.9 U35.12@200.525,117.85 206.446,117.85 U37.3@206.496,117.9 207.781,117.9 208.35,117.331 208.35,115.969 207.781,115.4 206.55,115.424 U37.5@206.496,115.425 ; 198.2,96.422 198.2,98.901 199.351,100.052 203.607,100.052 204.123,100.568 v1(204.123,102.695) ; v1(213.714,115.35) v1@213.852,115.35 ; U41.10@217.171,93.85 215.909,93.85 215.553,94.206 215.553,96.082 215.821,96.35 ; U41.12@217.171,96.35 215.821,96.35 ; U37.10@217.171,115.35 215.25,115.35 ; U37.12@217.171,117.85 215.909,117.85 215.3,117.241 215.3,115.4 215.25,115.35 ; 20.456,140.15 20.456,142.281 23.225,145.05 37.384,145.05 42.084,140.35 80.475,140.35 ; 80.196,137.85 80.475,138.129 80.475,140.35 ; 80.475,140.35 87.225,140.35 88.25,141.375 88.25,144.039 89.011,144.799 100.113,144.799 101.395,143.518 101.395,142.602 100.26,141.468 99.069,141.468 98.398,140.797 98.398,137.825 100.425,135.798 100.425,124.8 100.715,124.509 100.715,118.594 100.353,118.232 100.353,115.068 100.715,114.706 100.715,113.791 104.965,109.54 ; 104.965,109.54 106.765,111.34 106.765,111.397 107.35,111.981 107.35,115.35 107.3,115.4 ; 104.965,109.54 106.478,108.028 106.478,107.113 107.095,106.496 107.095,96.375 ; 107.3,115.4 U25.5@104.35,115.4 103.274,115.4 102.653,116.021 102.653,117.279 103.274,117.9 109.611,117.9 112.161,115.35 113.325,115.35 ; 107.3,115.4 109.712,115.4 111.125,113.987 111.125,112.05 113.148,110.027 113.875,110.027 ; 113.875,110.027 113.875,109.183 112.179,107.487 112.179,103.902 113.801,102.28 127.345,102.28 129.85,99.775 129.85,96.35 ; U55.5@144.35,93.9 154.975,93.9 U55.10@155.025,93.85 155.075,93.9 172.325,93.9 ; U55.5@144.35,93.9 140.269,93.85 U53.10@135.025,93.85 135.075,93.9 U55.5@144.35,93.9 ; 164.15,114.554 164.15,105.666 165.541,104.275 176.423,104.275 184.298,96.4 ; 172.325,93.9 176.975,93.9 U57.10@177.025,93.85 178.359,93.85 178.471,93.962 179.179,93.962 179.291,93.85 U39.10@200.525,93.85 206.446,93.85 U41.5@206.496,93.9 207.714,93.9 208.35,94.536 208.35,95.749 207.699,96.4 200.575,96.4 U39.12@200.525,96.35 200.475,96.4 184.298,96.4 ; v1@213.852,115.35 213.663,115.161 213.663,96.742 214.055,96.35 215.821,96.35 ; v1@213.852,115.35 215.25,115.35
  Bottom Layer w0.4: v1(69.808,15.85) 69.808,16.656 69.828,16.676
  Bottom Layer w0.6: v1(14.35,89.4) 23.3,89.4 v1(23.328,89.372) ; v1(17.002,138.348) v1(20.456,138.348) ; DC9.C5@28.95,9.85 27.604,8.504 17.281,8.504 16.468,9.317 16.468,13.532 19.784,16.848 40.328,16.848 40.5,16.676 48.024,16.676 48.345,16.997 51.952,16.997 52.273,16.676 55.256,16.676 55.695,17.115 55.695,17.162 56.196,17.663 56.903,17.663 57.745,16.821 63.967,16.821 64.113,16.676 69.828,16.676 73.128,16.676 75.068,18.615 79.611,18.615 82.211,21.216 85.97,21.216 86.116,21.362 86.172,21.362 v1(87.969,23.159) ; v1(49.056,88.564) 49.361,88.259 v1@57.894,88.259 ; v1(57.925,88.225) 57.925,88.228 v1@57.894,88.259 ; v1(69.097,88.259) v1@57.894,88.259 ; v1(119.2,93.9) 119.2,96.375 v1(119.225,96.35) ; v1(139.404,54.9) v1(144.34,54.9) ; v1(155.025,117.85) 155.66,118.485 161.858,118.485 v1(162.443,117.9) ; v1(158.962,111.119) 160.969,113.125 v1(162.721,113.125) ; v1(167.875,88.625) 171.325,88.625 v1(172.375,89.675) ; v1(204.123,102.695) 204.123,115.132 204.391,115.4 v1(206.55,115.4) 206.6,115.35 v1(213.714,115.35)
-12,6V: DC10.A3 DC10.B3 DC10.C3 | length 5
  Top Layer w0.4: DC10.A3@138.95,4.85 DC10.B3@138.95,7.35 DC10.C3@138.95,9.85
-23V: DC10.A2 DC10.B2 DC10.C2 | length 5
  Top Layer w0.4: DC10.A2@136.45,4.85 DC10.B2@136.45,7.35 DC10.C2@136.45,9.85
a: C51.1 R49.2 R50.2 R51.2 R52.2 R53.1 R54.1 R55.1 R56.1 R58.2 R59.1 R60.2 R61.2 U1.4 U1.11 U2.4 U2.11 U3.4 U3.11 U4.4 U4.11 U5.4 U5.11 U6.4 U6.11 U7.4 U7.11 U8.4 U8.11 U9.4 U9.11 U10.4 U10.11 U11.4 U11.11 U12.4 U12.11 U13.4 U13.11 U14.4 U14.11 U15.4 U15.11 U16.4 U16.11 U17.4 U17.11 U18.4 U18.11 U19.4 U19.11 U20.4 U20.11 U21.4 U21.11 U22.4 U22.11 U23.4 U23.11 U24.4 U24.11 U25.4 U25.11 U26.4 U26.11 U27.4 U27.11 U28.4 U28.11 U29.4 U29.11 U30.4 U30.11 U31.4 U31.11 U32.4 U32.11 U33.4 U33.11 U34.4 U34.11 U35.4 U35.11 U36.4 U36.11 U37.4 U37.11 U38.4 U38.11 U39.4 U39.11 U40.4 U40.11 U41.4 U41.11 U42.4 U42.11 U43.4 U43.11 U44.4 U44.11 U45.4 U45.11 U46.4 U46.11 U47.4 U47.11 U48.4 U48.11 U49.4 U49.11 U50.4 U50.11 U51.4 U51.11 U52.4 U52.11 U53.4 U53.11 U54.4 U54.11 U55.4 U55.11 U56.4 U56.11 U57.4 U57.11 | length 1713.6
  Top Layer w0.254: U30.4@177.35,33.65 U30.4@177.4,33.6
  Top Layer w0.4: v1(11.1,90.6) v1@11.05,90.65 ; v1(12.8,116.625) U44.4@14.35,116.65 24.975,116.65 U44.11@25.025,116.6 ; U3.4@14.35,68.15 U7.4@34.85,68.15 34.9,68.1 47.397,68.1 v1(48.599,66.897) 48.599,48.347 45.602,45.35 45.602,42.057 45.145,41.6 42.479,41.6 v1(41.69,40.812) ; U8.4@14.35,90.65 v1@11.05,90.65 ; U43.4@14.35,139.15 12.064,139.15 10.466,137.552 v1(10.466,116.6) 10.466,91.234 v1@11.05,90.65 ; U15.4@17.05,24.75 14.225,24.75 13.434,23.959 13.434,20.481 16.454,17.461 19.792,17.461 21.402,15.85 v1(32.525,15.85) 32.725,15.65 R50.2@35.425,15.65 35.425,16.752 32.35,19.826 32.354,19.83 32.354,24.596 32.408,24.65 ; U9.4@17.15,41.65 22.225,41.65 ; U8.11@25.025,90.6 34.8,90.6 U2.4@34.85,90.65 v1(39.049,90.65) 45.475,90.65 U2.11@45.525,90.6 47.3,90.6 47.95,89.95 47.95,86.876 49.641,85.185 v1(49.641,68.421) ; U43.11@25.025,139.1 34.8,139.1 U45.4@34.85,139.15 36.077,139.15 36.825,138.402 36.825,131.072 36.8,131.097 v1(36.8,131.1) ; U15.11@27.725,24.7 27.775,24.65 32.408,24.65 ; U9.11@27.825,41.6 27.758,41.667 27.741,41.65 22.225,41.65 ; v1(30.425,27.475) 29.975,27.925 29.975,29.075 ; v1(32.425,25.5) 32.425,24.667 32.408,24.65 ; v1(34.775,116.625) 34.825,116.625 U42.4@34.85,116.65 34.9,116.6 U42.11@45.525,116.6 45.537,116.588 52.367,116.588 52.63,116.851 52.925,116.851 ; U11.4@34.85,24.65 32.408,24.65 ; v1(35.315,41.65) 31.962,41.65 31.573,41.261 31.573,29.323 31.325,29.075 29.975,29.075 ; R50.2@35.4,15.625 v1(35.453,15.625) ; v1(38.425,15.65) 39.098,15.65 39.523,15.225 40.454,15.225 40.879,15.65 R49.2@41.425,15.65 R52.2@44.425,15.65 R54.1@47.425,15.65 R55.1@50.425,15.65 ; 44.026,131.1 v1(45.008,131.1) ; U11.11@45.525,24.6 48.075,24.6 ; v1(49.564,40.456) 50.758,41.65 U12.4@53.35,41.65 ; v1(52.384,24.403) 52.137,24.65 U14.4@50.35,24.65 50.3,24.6 48.075,24.6 ; v1(53.247,67.837) 53.56,68.15 U1.4@74.85,68.15 74.9,68.1 U1.11@85.525,68.1 ; U6.4@54.85,90.65 v1(56.958,90.65) ; R56.1@56.425,15.65 R53.1@53.425,15.65 R55.1@50.425,15.65 ; U14.11@61.025,24.6 63.426,24.6 64.587,25.76 64.587,34.904 65.643,35.96 65.643,41.643 65.65,41.65 ; U12.11@64.025,41.6 64.075,41.65 65.65,41.65 ; U6.11@65.525,90.6 v1(70.475,90.6) ; v1@70.475,90.65 80.146,90.65 80.196,90.6 U4.11@85.525,90.6 ; v1(73.212,24.962) 72.5,24.25 68.512,24.25 66.833,25.929 66.833,30.728 67.344,31.239 67.344,41.569 67.425,41.65 ; U49.4@74.85,139.15 74.8,139.1 U47.11@65.525,139.1 65.475,139.15 U47.4@54.85,139.15 54.8,139.1 U45.11@45.525,139.1 43.875,139.1 43.375,138.6 43.375,135.315 43.979,134.711 43.979,125.112 49.844,119.247 51.033,119.247 52.925,117.355 52.925,116.851 ; v1(76.387,24.962) 76.925,24.424 76.925,15.343 80.618,15.343 R59.1@80.925,15.65 80.925,16.429 81.289,16.793 88.909,16.793 89.425,16.277 R61.2@89.425,15.65 R60.2@92.425,15.65 ; U16.11@80.8,24.2 80.85,24.25 84.845,24.25 ; U13.11@83.525,41.6 83.475,41.65 67.425,41.65 ; v1(84.108,24.962) 84.845,24.25 ; U49.11@85.525,139.1 86.877,139.1 87.6,138.377 87.6,133.889 84.083,130.372 80.222,130.372 79.968,130.118 79.968,127.832 68.736,116.6 ; v1(88.388,115.805) 87.593,116.6 74.9,116.6 U46.4@74.85,116.65 72.195,116.65 72.145,116.6 68.736,116.6 ; U17.11@97.1,24.2 95.68,24.2 95.28,23.8 88.858,23.8 88.408,24.25 84.845,24.25 ; v1(102.828,94.863) 103.115,95.15 U51.4@104.35,95.15 ; U25.4@104.35,116.65 v1(105.99,116.65) 109.667,116.65 112.01,114.307 112.01,112.573 113.591,110.992 115.782,110.992 117.865,113.075 117.865,115.584 116.849,116.6 ; U24.4@104.35,137.15 114.975,137.15 U24.11@115.025,137.1 v1(118.043,137.1) ; U52.4@104.4,75.6 U52.4@104.35,75.65 114.975,75.65 U52.11@115.025,75.6 117.586,75.6 118.136,75.05 119.008,75.05 119.033,75.025 v1(119.618,75.025) ; v1(113.325,95.175) 113.4,95.1 124.3,95.1 U53.4@124.35,95.15 134.975,95.15 U53.11@135.025,95.1 135.075,95.15 154.975,95.15 U55.11@155.025,95.1 155.075,95.15 U57.4@166.35,95.15 166.4,95.1 169.6,95.1 ; U25.11@115.025,116.6 116.849,116.6 ; U28.4@115.35,33.65 125.975,33.65 U28.11@126.025,33.6 127.263,33.6 127.898,34.235 v1(127.898,35.379) ; U27.4@115.35,53.65 115.4,53.6 123.875,53.6 ; v1(120.557,42.361) 120.557,45.732 120.975,46.15 123.25,46.15 123.91,46.81 123.91,53.565 123.875,53.6 ; v1(122.589,138.779) 122.589,137.484 122.923,137.15 134.975,137.15 U22.11@135.025,137.1 144.3,137.1 144.35,137.15 154.975,137.15 U18.11@155.025,137.1 159.275,137.1 159.3,137.125 ; v1(124.35,75.6) U50.4@124.35,75.65 ; 133.545,95.1 133.257,94.812 133.257,89.167 140.4,82.024 v1(140.4,75.675) ; U23.11@135.025,116.6 135.075,116.65 137.375,116.65 ; U26.4@135.35,33.65 145.975,33.65 U26.11@146.025,33.6 148.775,33.6 ; v1(135.35,53.65) 126.075,53.65 U27.11@126.025,53.6 123.875,53.6 ; U56.4@144.35,75.65 154.975,75.65 U56.11@155.025,75.6 v1@157.083,75.6 ; v1(146.025,53.6) 155.3,53.6 U31.4@155.35,53.65 159.985,53.65 ; v1(148.777,32.836) 148.777,33.598 148.775,33.6 ; v1(157.133,73.908) v1@157.083,75.6 ; v1(157.133,75.65) v1@157.083,75.6 ; v1(160.918,66.793) v1(160.918,71.039) ; v1@160.974,66.775 162.925,66.775 ; U19.4@166.35,116.65 166.3,116.6 160.85,116.6 ; v1(169.986,33.446) 169.831,33.6 U32.11@166.025,33.6 165.975,33.65 154.119,33.65 153.163,34.606 150.103,34.606 149.097,33.6 148.775,33.6 ; v1(173.307,31.414) 173.307,33.655 173.75,34.098 175.564,34.098 176.012,33.65 U30.4@177.35,33.65 ; U54.11@177.025,75.6 176.975,75.65 163.763,75.65 162.925,74.812 162.925,66.775 ; U19.11@177.025,116.6 177.075,116.65 179.3,116.65 ; U30.4@177.4,33.6 U30.11@188.025,33.6 ; v1(185.308,68.571) 185.308,75.731 185.277,75.762 186.09,76.575 187.639,76.575 188.564,75.65 U36.4@189.85,75.65 189.9,75.6 U36.11@200.525,75.6 ; U33.11@188.025,53.6 185.68,53.6 185.4,53.88 180.15,53.88 179.92,53.65 U33.4@177.35,53.65 159.985,53.65 ; U38.4@206.496,75.65 206.671,75.825 215.36,75.825 215.585,75.6 U38.11@217.171,75.6 219.532,75.6 219.5,75.632 v1(219.5,75.65) ; U41.4@206.496,95.15 206.446,95.1 U39.11@200.525,95.1 200.475,95.15 183.447,95.15 U57.11@177.025,95.1 169.6,95.1 ; U37.4@206.496,116.65 206.446,116.6 U35.11@200.525,116.6 200.475,116.65 182.7,116.65 ; U41.11@217.171,95.1 218.449,95.1 219.457,96.108 ; U37.11@217.171,116.6 218.449,116.6 219.352,115.697 ; v1(219.511,81.129) 219.468,81.172 219.468,135.809 218.177,137.1 U34.11@217.171,137.1 217.121,137.15 200.575,137.15 U40.11@200.525,137.1 200.475,137.15 184.511,137.15 182.686,135.325 182.686,133.456 182.704,133.437 182.704,132.813 182.686,132.794 182.686,116.664 182.7,116.65 ; 22.225,41.65 22.293,41.582 22.293,36.757 29.975,29.075 ; 48.075,24.6 48.099,24.576 48.099,19.392 50.425,17.066 R55.1@50.425,15.65 ; 52.925,116.851 53.255,116.851 53.518,116.588 54.788,116.588 U48.4@54.85,116.65 60.156,116.65 60.206,116.6 68.736,116.6 ; 65.65,41.65 67.425,41.65 ; 116.849,116.6 123.124,116.6 U23.4@124.35,116.65 129.6,116.65 129.911,116.961 130.819,116.961 131.073,116.707 131.073,115.183 130.94,115.05 130.94,112.994 133.069,110.865 135.924,110.865 137.425,112.365 137.425,116.6 137.375,116.65 ; 137.375,116.65 145.565,116.65 145.938,117.023 151.707,117.023 152.13,116.6 159.35,116.6 ; 159.3,137.125 159.3,116.65 159.35,116.6 ; 159.3,137.125 159.3,141.759 160.029,142.488 161.553,142.488 162.848,141.192 162.848,138.5 164.198,137.15 176.975,137.15 U20.11@177.025,137.1 178.676,137.1 179.347,136.428 179.347,116.697 179.3,116.65 ; 159.35,116.6 160.85,116.6 ; 159.985,53.65 162.925,56.59 162.925,66.775 ; 160.85,116.6 160.816,116.566 160.816,107.709 169.6,98.925 169.6,95.1 ; 179.3,116.65 182.7,116.65
  Bottom Layer w0.4: v1@10.466,116.625 v1(12.8,116.625) ; v1(11.1,90.6) 11.508,90.6 ; v1(30.425,27.475) 30.45,27.475 v1(32.425,25.5) ; v1(34.775,116.625) 29.802,111.652 27.477,111.652 14.825,99 14.825,93.917 11.508,90.6 ; v1(35.315,41.65) 36.153,40.812 v1(41.69,40.812) 44.655,40.812 46.026,39.44 48.548,39.44 v1(49.564,40.456) ; v1(35.453,15.625) 35.478,15.65 v1(38.425,15.65) ; v1(36.8,131.1) v1(45.008,131.1) ; v1(48.599,66.897) 49.539,67.837 50.225,67.837 ; v1(49.641,68.421) 50.225,67.837 ; v1(52.384,24.403) 56.242,24.403 57.004,25.165 73.009,25.165 v1(73.212,24.962) v1(76.387,24.962) v1(84.108,24.962) ; v1(53.247,67.837) 50.225,67.837 ; v1@56.911,90.697 56.814,90.6 11.508,90.6 ; v1(56.958,90.65) 57.463,90.65 57.513,90.6 v1(70.475,90.6) ; v1(88.388,115.805) 105.145,115.805 v1(105.99,116.65) ; v1(102.828,94.863) 103.26,95.295 103.38,95.175 v1(113.325,95.175) ; v1(118.043,137.1) 119.722,138.779 v1(122.589,138.779) ; v1(119.618,75.025) 120.975,75.025 121.55,75.6 v1(124.35,75.6) v1(135.225,75.6) 140.325,75.6 v1(140.4,75.675) 157.108,75.675 v1(157.133,75.65) ; v1(120.557,42.361) 127.517,35.401 ; v1(127.898,35.379) 128.319,35.8 145.813,35.8 v1(148.777,32.836) ; v1(135.35,53.65) 145.975,53.65 v1(146.025,53.6) ; v1(157.133,73.908) 160.002,71.039 v1(160.918,71.039) ; v1(160.918,66.793) 161.469,67.344 182.574,67.344 184.151,68.921 184.904,68.921 185.254,68.571 v1(185.308,68.571) ; v1(169.986,33.446) 172.018,31.414 v1(173.307,31.414) ; v1(219.5,75.65) 219.519,75.669 219.511,75.676 v1(219.511,81.129)
"a pr": DC9.A15 DC9.B15 DC9.C15 U15.1 U15.14 | length 85.7
  Top Layer w0.4: U15.1@17.05,28.5 24.275,28.5 ; v1(24.275,26.45) 24.275,28.5 ; U15.14@27.725,28.5 24.275,28.5 ; DC9.A15@53.95,4.85 DC9.C15@53.95,9.85
  Bottom Layer w0.4: v1(13.7,28.45) 13.675,28.475 v1(17.025,28.475) ; v1(24.275,26.45) 24.275,25.846 14.435,16.005 14.435,7.495 18.234,3.696 52.346,3.696 53.5,4.85 DC9.A15@53.95,4.85
"b pr": DC9.A16 DC9.B16 DC9.C16 pad.3 U16.1 U16.14 | length 58
  Top Layer w0.4: DC9.A16@56.45,4.85 DC9.C16@56.45,9.85 ; v1(60.025,8.525) 60.025,9.101 60.296,9.372 60.296,10.328 61.747,11.779 v1(63.534,11.779) ; U16.1@70.125,28 75.075,28 ; pad.3@75.075,31 75.075,28 ; v1(78.292,16.097) 78.292,26.933 77.225,28 ; U16.14@80.8,28 77.225,28 ; 75.075,28 77.225,28
  Bottom Layer w0.254: v1(63.534,11.779) 63.569,11.744 74.853,11.744 78.292,15.183 v1(78.292,16.097)
  Bottom Layer w0.4: DC9.C16@56.45,9.85 57.782,8.518 57.788,8.525 v1(60.025,8.525)
NetC1_2: C1.2 U1.7 U2.2 U8.13 | length 117.2
  Top Layer w0.4: C1.2@18.025,81.5 18.025,72.529 18.729,71.825 v1(19.6,71.825) 19.625,71.8 21.422,71.8 22.275,72.653 22.275,92.237 23.138,93.1 34.8,93.1 U2.2@34.85,93.15 ; v1(57.75,56.275) 58.3,56.825 65.586,56.825 73.161,64.4 U1.7@74.85,64.4
  Bottom Layer w0.4: v1(19.6,71.825) 19.6,70.954 26.941,63.613 39.92,63.613 42.3,61.233 42.3,57.975 41.157,56.832 41.157,56.255 41.987,55.425 56.9,55.425 v1(57.75,56.275)
  other v1: 18,81.4
NetC2_2: C2.2 U1.8 U2.13 U4.2 | length 133.4
  Top Layer w0.4: v1(38.525,79.575) C2.2@38.525,81.5 ; U2.13@45.525,93.1 47.126,93.1 v1(49.549,95.523) ; v1(72.969,93.15) v1(77.439,93.15) ; v1(85.505,63.087) 85.505,64.35 U1.8@85.525,64.35 ; v1(92.211,78.759) 92.545,78.425 92.545,68.559 93.903,67.201 93.903,63.253 v1(93.738,63.087)
  Bottom Layer w0.4: v1(38.525,79.575) 39.341,78.759 84.261,78.759 ; v1(49.549,95.523) 50.001,95.975 70.144,95.975 v1(72.969,93.15) ; v1(77.439,93.15) 83.053,87.537 83.053,79.967 84.261,78.759 ; v1(85.505,63.087) v1(93.738,63.087) ; v1(92.211,78.759) 84.261,78.759
NetC3_2: C3.2 U4.13 U5.7 U6.2 | length 76.4
  Top Layer w0.4: U5.7@54.85,64.4 53.527,64.4 52.485,65.441 52.485,77.185 56.8,81.5 C3.2@58.525,81.5 58.525,85.764 60.309,87.548 60.309,91.778 58.937,93.15 56.143,93.15 ; U6.2@54.85,93.15 56.143,93.15 ; v1(56.448,98.647) 56.448,93.455 56.143,93.15 ; v1(78.749,98.647) 84.296,93.1 U4.13@85.525,93.1
  Bottom Layer w0.4: v1(56.448,98.647) v1(78.749,98.647)
NetC4_2: C4.2 U5.8 U6.13 U8.2 | length 106.3
  Top Layer w0.4: U8.2@14.35,93.15 18,93.15 v1(18.075,93.075) ; U5.8@65.525,64.35 71.401,64.35 v1(72.145,65.094) ; v1(72.145,71.038) 72.145,72.6 78.025,78.48 v1(78.025,81.5) v1(78.025,83.877)
  Bottom Layer w0.4: v1(18.075,93.075) 18.108,93.108 v1(65.708,93.108) 65.708,93.758 66.864,94.914 69.63,94.914 74.888,89.656 79.714,89.656 81.67,87.7 81.67,85.16 81.111,84.601 78.749,84.601 v1(78.025,83.877) ; v1(72.145,65.094) v1(72.145,71.038)